# Altium PCB ArmBand-Control-Board.PcbDoc (part 2 of 3)
Units mm, origin at the board's own origin, x right, y up, seen from the top; angles counter-clockwise.
Board outline 45 x 45 mm, 2 copper layers (Top Layer, Bottom Layer), stack 0.864 mm thick; 111 components, 96 nets, 439 pads, 181 vias.
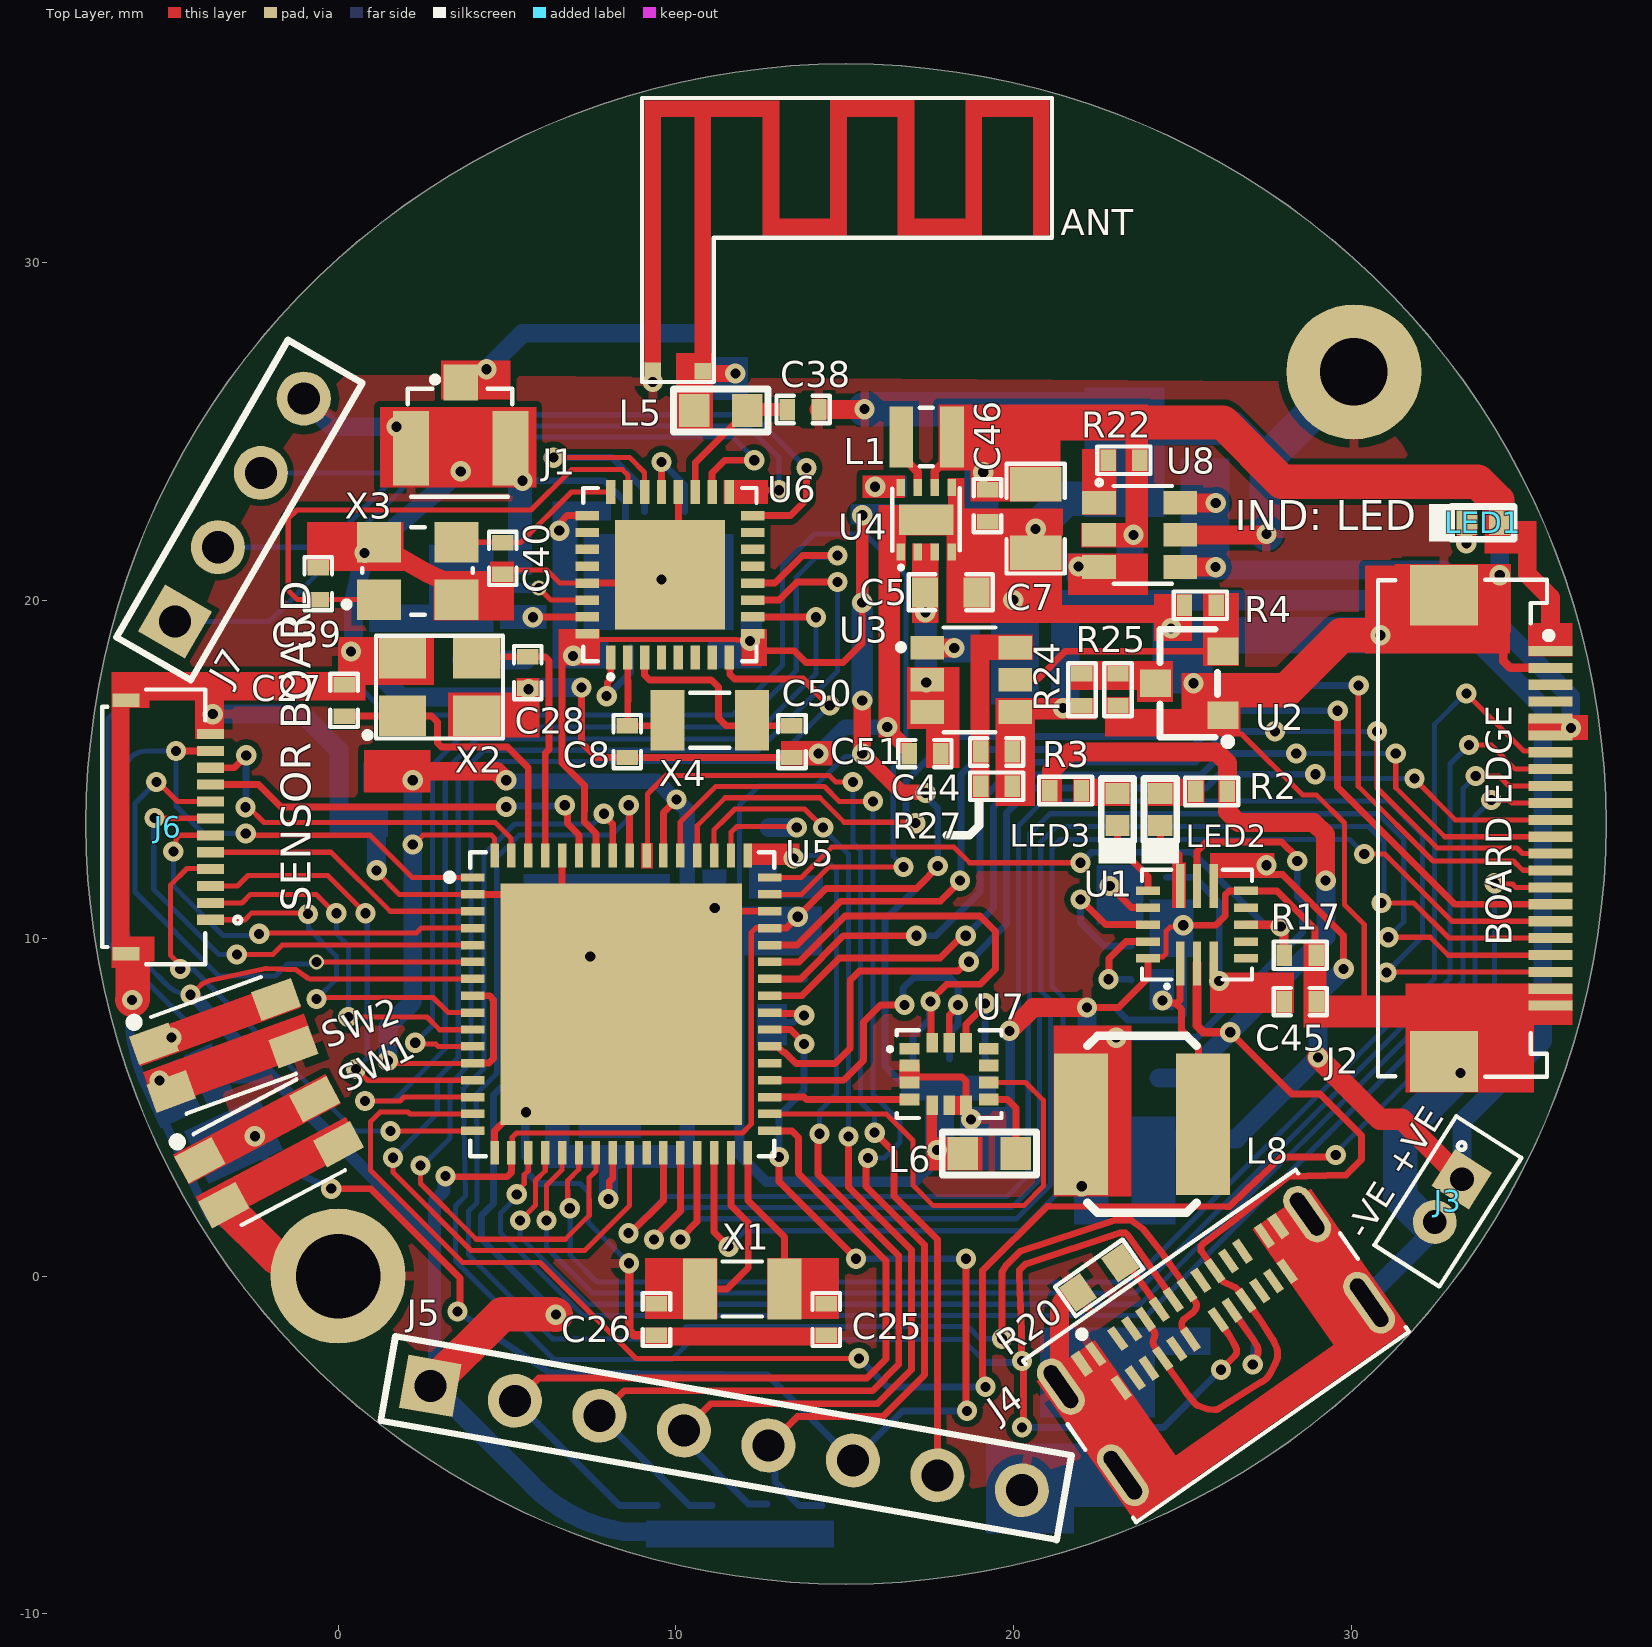
[diagram p0: Top Layer view]

## Part data (continued)
R4 R5 R6 R12 R18 R19 R22 R23 R25 R27: library part RC0402FR-0710KL, "RES SMD 10K OHM 1% 1/16W 0402", Case Code (Imperial)=0402, Case Code (Metric)=1005, Manufacturer=Yageo, Max Operating Temperature=155°C, Min Operating Temperature=-55°C, Power Rating=62.5mW, Resistance=10kR, Supplier Part Number 1=311-10.0KLRDKR-ND, Temperature Coefficient=100ppm/°C, Tolerance=1%, Voltage Rating=50V, Case/Package=0402, ComponentLink1Description=http://www.farnell.com/datasheets/2167052.pdf?src-supplier=Element14, ComponentLink1URL=http://www.farnell.com/datasheets/2167052.pdf?src-supplier=Element14, ComponentLink2Description=http://www.farnell.com/datasheets/1686128.pdf?src-supplier=Element14, ComponentLink2URL=http://www.farnell.com/datasheets/1686128.pdf?src-supplier=Element14, ComponentLink3Description=http://www.farnell.com/datasheets/1784430.pdf?src-supplier=Element14, ComponentLink3URL=http://www.farnell.com/datasheets/1784430.pdf?src-supplier=Element14, ComponentLink4Description=http://www.yageo.com/documents/recent/PYu-RC_Group_51_RoHS_L_9.pdf?src-supplier=Mouser, ComponentLink4URL=http://www.yageo.com/documents/recent/PYu-RC_Group_51_RoHS_L_9.pdf?src-supplier=Mouser, Composition="Thick Film", Depth=0.5mm, Height=0.32mm, Lead Free="Lead Free", Lead Pitch=0.2mm, Length=1mm, Manufacturer Part Number=RC0402FR-0710KL, Military Standard=Not, Number of Pins=2, Number of Terminations=2, Packaging="Tape and Reel", Pricing 1="1=0.1, 10=0.016, 100=0.0064, 1000=0.00289, 2500=0.00251, 5000=0.00207 (USD)", REACH SVHC="No SVHC", Stock 1=60122563, Supplier 1=Digi-Key, Termination=SMD/SMT, Voltage Rating (DC)=50V, Width=0.5mm, Working Voltage=50V
R7 R8 R13 R14 R15 R16 R17 R26: library part ERJPA2F1003X, "RES SMD 100K OHM 1% 1/5W 0402", Case Code (Imperial)=0402, Case Code (Metric)=1005, Manufacturer=Panasonic, Manufacturer Part Number=ERJ-PA2F1003X, Max Operating Temperature=155°C, Max Power Dissipation=200mW, Min Operating Temperature=-55°C, Resistance=100kR, Supplier Part Number 1=P17236CT-ND, Temperature Coefficient=100ppm/°C, Tolerance=1%, Voltage Rating=50V, Case/Package=0402, ComponentLink1Description=http://www.farnell.com/datasheets/2051174.pdf?src-supplier=Element14, ComponentLink1URL=http://www.farnell.com/datasheets/2051174.pdf?src-supplier=Element14, ComponentLink2Description=https://industrial.panasonic.com/ww/system/files/data/download/catalog/id_fixed-resistors_e_1.pdf?src-supplier=Digi-Key, ComponentLink2URL=https://industrial.panasonic.com/ww/system/files/data/download/catalog/id_fixed-resistors_e_1.pdf?src-supplier=Digi-Key, Composition="Thick Film", Features="Automotive AEC-Q200", Height=0.016inch, Length=0.039inch, Number of Terminations=2, Packaging="Cut Tape", Power Rating=200mW, Pricing 1="1=0.21, 10=0.175, 100=0.0686, 1000=0.02871, 2500=0.02632, 5000=0.02393 (USD)", REACH SVHC=Unknown, Stock 1=8829, Supplier 1=Digi-Key, Voltage Rating (DC)=50V, Width=0.02inch
R10 R11: library part ERJ2GEJ472X, "RES SMD 4.7K OHM 5% 1/10W 0402", Case Code (Imperial)=0402, Case Code (Metric)=1005, Manufacturer=Panasonic, Manufacturer Part Number=ERJ-2GEJ472X, Max Operating Temperature=155°C, Max Power Dissipation=100mW, Min Operating Temperature=-55°C, Package Quantity=1, Resistance=4.7kR, Resistance Tolerance=5%, Resistor Type="Thick Film", Temperature Coefficient=200ppm/°C, Voltage Rating=50V, Case/Package=0402, Category="Chip SMD Resistors", ComponentLink1Description=https://datasheet.ciiva.com/11821/0900766b80f806dd-11821328.pdf?src-supplier=RSComponents, ComponentLink1URL=https://datasheet.ciiva.com/11821/0900766b80f806dd-11821328.pdf?src-supplier=RSComponents, ComponentLink2Description=https://datasheet.ciiva.com/46377/1678796-46377565.pdf?src-supplier=Element14, ComponentLink2URL=https://datasheet.ciiva.com/46377/1678796-46377565.pdf?src-supplier=Element14, ComponentLink3Description=https://datasheet.ciiva.com/28514/1678796-28514168.pdf?src-supplier=Element14, ComponentLink3URL=https://datasheet.ciiva.com/28514/1678796-28514168.pdf?src-supplier=Element14, ComponentLink4Description=https://datasheet.ciiva.com/16758/70260739-16758341.pdf?src-supplier=Allied+Electronics, ComponentLink4URL=https://datasheet.ciiva.com/16758/70260739-16758341.pdf?src-supplier=Allied+Electronics, ComponentLink5Description=https://datasheet.ciiva.com/16770/70260739-16770309.pdf?src-supplier=Allied+Electronics, ComponentLink5URL=https://datasheet.ciiva.com/16770/70260739-16770309.pdf?src-supplier=Allied+Electronics, Construction=Rectangular, Contact Plating=Tin, Depth=0.5mm, Features="Automotive AEC-Q200", Height=0.35mm, Lead Free="Lead Free", Length=1mm, Military Standard=Not, Mount="Surface Mount", Number of Terminations=2, Packaging="Cut Tape", Power Rating=100mW, Pricing 1="10000=0.00340 (USD)", Radiation Hardening=No, REACH SVHC="No SVHC", RoHS=Yes, RoHS Compliant=Yes, Series=ERJ, Size Code=0402, Stock 1=1650000, Supplier 1="Arrow Electronics", Supplier Part Number 1=ERJ-2GEJ472X, Technology="THICK FILM", Termination=SMD/SMT, Tolerance=5%, Voltage Rating (DC)=50V, Width=0.5mm
R20 R21: library part RMCF0603FT5K10, "RES 5.1K OHM 1% 1/10W 0603", Case Code (Imperial)=0603, Case Code (Metric)=1608, Manufacturer="Stackpole Electronics", Max Operating Temperature=155°C, Max Power Dissipation=100mW, Min Operating Temperature=-55°C, Resistance=5.1kR, Resistor Type="Thick Film", Supplier Part Number 1=RMCF0603FT5K10DKR-ND, Temperature Coefficient=100ppm/°C, Tolerance=1%, Case/Package=0603, ComponentLink1Description=https://www.seielect.com/catalog/SEI-RMCF_RMCP.pdf?src-supplier=Avnet, ComponentLink1URL=https://www.seielect.com/catalog/SEI-RMCF_RMCP.pdf?src-supplier=Avnet, ComponentLink2Description=http://components.arrow.com/part/dataview/50863347S9465827N1174?src-supplier=Arrow+Electronics, ComponentLink2URL=http://components.arrow.com/part/dataview/50863347S9465827N1174?src-supplier=Arrow+Electronics, ComponentLink3Description=https://www.seielect.com/catalog/SEI-Packaging.pdf?src-supplier=Digi-Key, ComponentLink3URL=https://www.seielect.com/catalog/SEI-Packaging.pdf?src-supplier=Digi-Key, Contact Plating=Tin,Matte, Features="Automotive AEC-Q200", Height=0.022inch, Length=0.061inch, Manufacturer Part Number=RMCF0603FT5K10, Mount="Surface Mount", Number of Terminations=2, Packaging="Tape and Reel", Pricing 1="1=0.1, 10=0.017, 100=0.0068, 1000=0.00305, 2500=0.00264 (USD)", Radiation Hardening=No, RoHS Compliant=Yes, Series=RMCF, Stock 1=58341, Supplier 1=Digi-Key, Width=0.031inch
R24: library part AC0402DR-0710K7L, "RES SMD 0402 10.7kOhm 0.5% Paper T/R", Manufacturer=Yageo, Category="Chip SMD Resistors", Manufacturer Part Number=AC0402DR-0710K7L, Pricing 1="10000=0.00820 (USD)", RoHS=Yes, RoHS Compliant=Yes, Supplier 1=Avnet, Supplier Part Number 1=AC0402DR-0710K7L
SB1 SB2 SB3: "Solder Bridge ON"
SW1 SW2: "3mm 2mm Round Button 50mA Top3.65mm SPST 12V SMD Tactile Switches", Manufacturer=XKB, ComponentLink1Description=LCSC, ComponentLink1URL=https://lcsc.com/product-detail/Tactile-Switches_XKB-Connectivity-TS-1185EC-C-D-B_C318893.html, Manufacturer Part Number=TS-1185EC-C-D-B
U1: "2.1A, 1- OR 2-CELL LI-ION BATTER", Manufacturer="Monolithic Power Systems", Supplier Part Number 1=1589-MP2615CGQ-ZCT-ND, Category=Uncategorized, Manufacturer Part Number=MP2615CGQ-Z, Pricing 1="1=2.38000, 10=2.13500, 25=2.01400, 100=1.71590, 250=1.61120, 500=1.40980, 1000=1.16812, 2500=1.14000 (USD)", RoHS=No, Stock 1=5000, Supplier 1=Digi-Key
U2: "IC MPU/RESET CIRC SOT23-3", Case/Package=SOT-23, Manufacturer=Maxim, Max Operating Temperature=105°C, Max Output Current=20mA, Max Power Dissipation=320mW, Max Reset Threshold Voltage=2.96V, Max Supply Voltage=5.5V, Min Operating Temperature=-40°C, Min Reset Threshold Voltage=2.89V, Min Supply Voltage=1.2V, Nominal Supply Current=17uA, Number of Voltages Monitored=1, Operating Supply Current=60uA, Supplier Part Number 1=700-MAX809SEURT, Threshold Voltage=2.93V, Category="Voltage Supervisors", ComponentLink1Description=https://datasheet.ciiva.com/1169/max803-max810z-1169879.pdf?src-supplier=Element14, ComponentLink1URL=https://datasheet.ciiva.com/1169/max803-max810z-1169879.pdf?src-supplier=Element14, ComponentLink2Description=https://datasheet.ciiva.com/1169/max803-max810z-1169878.pdf?src-supplier=Element14, ComponentLink2URL=https://datasheet.ciiva.com/1169/max803-max810z-1169878.pdf?src-supplier=Element14, ComponentLink3Description=https://datasheet.ciiva.com/14226/max803-max810z-14226330.pdf?src-supplier=Avnet, ComponentLink3URL=https://datasheet.ciiva.com/14226/max803-max810z-14226330.pdf?src-supplier=Avnet, ComponentLink4Description=https://datasheet.ciiva.com/1973/max803-max810z-1973322.pdf?src-supplier=Digi-Key, ComponentLink4URL=https://datasheet.ciiva.com/1973/max803-max810z-1973322.pdf?src-supplier=Digi-Key, ComponentLink5Description=https://datasheet.ciiva.com/1973/max803-max810z-1973323.pdf?src-supplier=Digi-Key, ComponentLink5URL=https://datasheet.ciiva.com/1973/max803-max810z-1973323.pdf?src-supplier=Digi-Key, ComponentLink6Description=https://datasheet.ciiva.com/1973/max803-max810z-1973321.pdf?src-supplier=Digi-Key, ComponentLink6URL=https://datasheet.ciiva.com/1973/max803-max810z-1973321.pdf?src-supplier=Digi-Key, Height=0.94mm, Lead Free="Lead Free", Length=2.92mm, Manufacturer Part Number=MAX809SEUR+T, Mount="Surface Mount", Number of Pins=3, Output=TOTEM-POLE, Output Type=PUSH-PULL, Overvoltage Threshold=2.96V, Package Quantity=1, Packaging="Cut Tape", Power Dissipation=320mW, Pricing 1="1=3.68000, 10=3.31000, 25=3.13000, 50=3.13000, 100=2.72000, 250=2.58000, 500=2.31000, 1000=2.09000, 10000=2.01000 (USD)", Radiation Hardening=No, REACH SVHC="No SVHC", Reset="Active Low", Reset Timeout=140ms, RoHS=Yes, RoHS Compliant=Yes, Series=-, Stock 1=26180, Supplier 1=Mouser, Termination=SMD/SMT, Type="Simple Reset/Power-On Reset", Undervoltage Threshold=2.89V, Watchdog Timer=No, Width=1.3mm
U3: "IC PWR SWITCH P-CH 1:1 SUPERSOT6", Case/Package=SOT-23-6, Continuous Drain Current (ID)=2.3A, Drain to Source Voltage (Vdss)=20V, Manufacturer="ON Semiconductor / Fairchild", Max Operating Temperature=150°C, Max Power Dissipation=700mW, Min Input Voltage=3V, Min Operating Temperature=-55°C, On-State Resistance=80mR, Output Current=1.6A, Package Quantity=3000, Supplier Part Number 1=58K8823, Category="Hot Swap Controllers", ComponentLink1Description=https://datasheet.ciiva.com/34302/1222713-34302120.pdf?src-supplier=Jameco, ComponentLink1URL=https://datasheet.ciiva.com/34302/1222713-34302120.pdf?src-supplier=Jameco, ComponentLink2Description=https://datasheet.ciiva.com/4898/fdc6330l-102811-4898611.pdf?src-supplier=Mouser, ComponentLink2URL=https://datasheet.ciiva.com/4898/fdc6330l-102811-4898611.pdf?src-supplier=Mouser, ComponentLink3Description=https://datasheet.ciiva.com/1171/fdc6330l-1171185.pdf?src-supplier=Newark, ComponentLink3URL=https://datasheet.ciiva.com/1171/fdc6330l-1171185.pdf?src-supplier=Newark, ComponentLink4Description=https://datasheet.ciiva.com/1572/276121-1572006.pdf?src-supplier=Farnell, ComponentLink4URL=https://datasheet.ciiva.com/1572/276121-1572006.pdf?src-supplier=Farnell, ComponentLink5Description=https://datasheet.ciiva.com/28483/276121-28483263.pdf?src-supplier=Element14, ComponentLink5URL=https://datasheet.ciiva.com/28483/276121-28483263.pdf?src-supplier=Element14, ComponentLink6Description=https://datasheet.ciiva.com/1512/276121-1512459.pdf?src-supplier=Element14, ComponentLink6URL=https://datasheet.ciiva.com/1512/276121-1512459.pdf?src-supplier=Element14, ComponentLink7Description=https://datasheet.ciiva.com/3232/fdc6330l-3232841.pdf?src-supplier=Avnet, ComponentLink7URL=https://datasheet.ciiva.com/3232/fdc6330l-3232841.pdf?src-supplier=Avnet, ComponentLink8Description=https://datasheet.ciiva.com/17090/fdc6330l-17090428.pdf?src-supplier=Future+Electronics, ComponentLink8URL=https://datasheet.ciiva.com/17090/fdc6330l-17090428.pdf?src-supplier=Future+Electronics, ComponentLink9Description=https://datasheet.ciiva.com/3232/fdc6330l-3232552.pdf?src-supplier=Avnet, ComponentLink9URL=https://datasheet.ciiva.com/3232/fdc6330l-3232552.pdf?src-supplier=Avnet, ComponentLink10Description=https://datasheet.ciiva.com/1962/fdc6330l-1962053.pdf?src-supplier=Digi-Key, ComponentLink10URL=https://datasheet.ciiva.com/1962/fdc6330l-1962053.pdf?src-supplier=Digi-Key, ComponentLink11Description=https://datasheet.ciiva.com/1962/fdc6330l-1962054.pdf?src-supplier=Digi-Key, ComponentLink11URL=https://datasheet.ciiva.com/1962/fdc6330l-1962054.pdf?src-supplier=Digi-Key, ComponentLink12Description=https://datasheet.ciiva.com/1962/fdc6330l-1962052.pdf?src-supplier=Digi-Key, ComponentLink12URL=https://datasheet.ciiva.com/1962/fdc6330l-1962052.pdf?src-supplier=Digi-Key, Current=2.3A, Current Rating=2.3A, Height=1mm, Interface=On/Off, Lead Free="Lead Free", Length=3mm, Manufacturer Part Number=FDC6330L, Max Input Voltage=20V, Max Output Current=2.3A, Max Supply Voltage=20V, Min Supply Voltage=3V, Mount="Surface Mount", Number of Outputs=1, Number of Pins=6, Operating Supply Voltage=20V, Output Configuration="High Side", Packaging="Tape and Reel", Power Dissipation=700mW, Power Rating=700mW, Pricing 1="1=0.70000, 25=0.57700, 50=0.52400, 100=0.47100, 250=0.43700, 500=0.37200, 1000=0.30700 (USD)", Radiation Hardening=No, REACH SVHC="No SVHC", RoHS=Yes, RoHS Compliant=Yes, Supplier 1=Newark, Voltage=20V, Voltage Rating (DC)=20V, Weight=0.036g, Width=1.7mm
U4: "Buck Switching Regulator IC Positive Fixed 3.3V 1 Output 1A 8-WFDFN Exposed Pad", Case/Package=SOIC, Manufacturer="Texas Instruments", Max Input Voltage=17V, Max Operating Temperature=125°C, Max Output Current=1A, Max Output Voltage=3.3V, Min Input Voltage=3V, Min Operating Temperature=-40°C, Package Quantity=3000, Quiescent Current=17uA, Supplier Part Number 1=595-TPS62162DSGR, Switching Frequency=2.25MHz, Category="Voltage Regulators - Switching", ComponentLink1Description=https://datasheet.ciiva.com/2034/tps62161-2034675.pdf?src-supplier=Digi-Key, ComponentLink1URL=https://datasheet.ciiva.com/2034/tps62161-2034675.pdf?src-supplier=Digi-Key, Contact Plating=Gold, Lead Free="Lead Free", Manufacturer Part Number=TPS62162DSGR, Min Output Voltage=3.3V, Number of Outputs=1, Number of Pins=8, Operating Supply Voltage=17V, Output Configuration=Positive, Output Current=1A, Output Type=Fixed, Output Voltage=3.3V, Packaging="Tape and Reel", Pricing 1="1=1.59000, 10=1.44000, 25=1.36000, 50=1.36000, 100=1.16000, 250=1.09000, 500=0.94700, 1000=0.78500, 10000=0.78400 (USD)", Radiation Hardening=No, RoHS=Yes, RoHS Compliant=Yes, Series=DCS-Control™, Supplier 1=Mouser, Synchronous Rectifier=Yes
U5: "IC MCU 32BIT 512KB FLASH 64QFN", Case/Package=QFN, Frequency=120MHz, Manufacturer=Microchip, Max Operating Temperature=85°C, Min Operating Temperature=-40°C, Supplier Part Number 1=ATSAM4S8BA-MU-ND, Category=Microcontrollers, ComponentLink1Description=http://www.microchip.com/mymicrochip/filehandler.aspx?ddocname=en590343&src-supplier=Digi-Key, ComponentLink1URL=http://www.microchip.com/mymicrochip/filehandler.aspx?ddocname=en590343&src-supplier=Digi-Key, Core Architecture=ARM, Interface=I2C,SPI,USB,IrDA,UART,USART, Manufacturer Part Number=ATSAM4S8BA-MU, Memory Size=512KB, Memory Type=FLASH, Number of I/Os=47, Oscillator Type=Internal, Packaging=Tray, Peripherals="Brown-out Detect/Reset,POR,PWM,WDT,DMA", Pricing 1="1=6.23000, 25=5.66960, 100=5.13000 (USD)", RoHS=Yes, RoHS Compliant=Yes, Supplier 1=Digi-Key
U6: "IC RF TXRX+MCU BLUETOOTH 32WFQFN", Manufacturer="Nordic Semiconductor", Supplier Part Number 1=1490-NRF52810-QCAA-RCT-ND, Category="RF Receivers, Transceivers", Manufacturer Part Number=NRF52810-QCAA-R, Pricing 1="1=3.54000, 10=3.16200, 25=2.84640, 100=2.59320, 250=2.34024, 500=2.09990, 1000=1.77100 (USD)", RoHS=Yes, RoHS Compliant=Yes, Stock 1=2906, Supplier 1=Digi-Key
U7: "iNEMO Inertial Module: 3D Accelerometer and 3D Gyroscope, 1.71V to 3.6V, -40°C to 85°C, VFLGA-14L, RoHS", Manufacturer=STMicroelectronics, Supplier Part Number 1=03AH2347, Category="Inertial Measurement Units (IMUs)", ComponentLink1Description=https://www.st.com/resource/en/datasheet/lsm6dsr.pdf?src-supplier=Digi-Key, ComponentLink1URL=https://www.st.com/resource/en/datasheet/lsm6dsr.pdf?src-supplier=Digi-Key, Manufacturer Part Number=LSM6DSRTR, RoHS=Yes, RoHS Compliant=Yes, Supplier 1=Newark
U8: "300mA 75dB@1kHz 10nA 90mV 2.8V~2.8V 2 6V SOT-23-6 Linear Voltage Regulators (LDO) ROHS", Manufacturer=AnaSem, ComponentLink1Description=LCSC, ComponentLink1URL=https://lcsc.com/product-detail/Linear-Voltage-Regulators-LDO_AnaSem-VRD2828PTX_C697937.html, Manufacturer Part Number=VRD2828PTX
X1 X4: library part X321532768KGD2SI, "32.768kHz SMD Crystal Resonator 12.5pF ±20ppm -40℃~+85℃ SMD3215-2P Crystals ROHS", Manufacturer="Yangxing Tech", ComponentLink1Description=LCSC, ComponentLink1URL=https://www.lcsc.com/product-detail/Crystals_Yangxing-Tech-X321532768KGD2SI_C620155.html, Manufacturer Part Number=X321532768KGD2SI
X2: library part X322516MOB4SI, "16MHz SMD Crystal Resonator 12pF ±10ppm ±30ppm -40℃~+85℃ SMD3225-4P Crystals ROHS", Manufacturer="Yangxing Tech", ComponentLink1Description=LCSC, ComponentLink1URL=https://www.lcsc.com/product-detail/Crystals_Yangxing-Tech-X322516MOB4SI_C12668.html, Manufacturer Part Number=X322516MOB4SI
X3: library part XC32M4-32.000-F12NLDT, "32MHz SMD Crystal Resonator 12pF 40Ω ±10ppm ±20ppm -40℃~+85℃ SMD3225-4P Crystals ROHS", Manufacturer=HCI, Manufacturer Part Number=XC32M4-32.000-F12NLDT

## Free pads (board coordinates)
  round 4 hole 2.5: MH1(0,0)
  round 4 hole 2: MH2(30.074,26.772)

## Via types
v1: diameter 0.6, hole 0.3, Top Layer to Bottom Layer, tented both sides, 178 vias
v2: diameter 0.45, hole 0.3, Top Layer to Bottom Layer, tented both sides, 2 vias
v3: diameter 0.6, hole 0.3, Top Layer to Bottom Layer, 1 vias

## Nets (pads, with @x,y where several pads share a name; then routed paths per layer and width w, separated by ;. In a path a pad name is that pad's centre, name@x,y a point inside that pad or via, vN(x,y) a via of type N, cw(c..) or ccw(c..) an arc to the next point about the centre after c; other vN are vias at no path point)
\A\C\O\K\: LED3.2 U1.12 | length 2.3
  Top Layer w0.203: LED3.2@23.073,13.342 23.073,12.74 23.978,11.836 U1.12@23.978,11.406
\C\H\G\O\K\: LED2.2 U1.11 | length 2.2
  Top Layer w0.203: LED2.2@24.343,13.342 24.343,12.766 24.484,12.626 24.747,12.626 24.892,12.481 24.892,12.223 24.904,12.211 24.904,11.579 U1.11@24.928,11.556
ANT: C38.2 L5.2 U6.19 | length 4.4
  Top Layer w0.203: U6.19@10.575,23.216 10.575,24.09 11.73,25.245 11.765,25.245 12.113,25.594 L5.2@12.113,25.629 ; C38.2@13.17,25.527 C38.2@13.297,25.654
  Top Layer w0.381: L5.2@12.139,25.654 C38.2@13.297,25.654
ANT#: ANT.ANT# L5.1 SB3.1 | length 4.1
  Top Layer w0.5: 10.541,27.076 10.541,26.79 10.541,26.721 ; L5.1@10.543,25.629 10.541,25.631 10.541,26.721 ; 10.566,26.187 10.566,26.274 ; v3@11.733,26.721 10.541,26.721
  Bottom Layer w0.5: SB3.1@10.566,26.391 10.602,26.426 11.438,26.426 11.733,26.721 v3(11.76,26.721)
AVDD: C32.1 L3.2 U6.30 | length 3.2
  Top Layer w0.152: v2(5.944,20.371) 6.299,20.015 U6.30@7.374,20.015
  Bottom Layer w0.152: 4.394,20.269 4.496,20.371
  Bottom Layer w0.305: 4.496,20.371 v2(5.944,20.371)
BATT_EN: R17.2 U1.6 U5.48 | length 18.8
  Top Layer w0.152: U5.48@12.782,11.802 13.715,11.802 14.613,12.7 18.237,12.7 18.697,12.239 v1(21.981,12.239)
  Top Layer w0.254: U1.6@26.878,10.406 26.88,10.404 27.853,10.404 v1(27.906,10.351) ; v1@27.894,10.408 v1@27.933,10.447 ; v1@27.975,10.404 27.991,10.389 28.002,10.377 28.002,9.51 R17.2@28.014,9.499
  Bottom Layer w0.203: v1(21.981,12.239) 21.99,12.239 22.299,12.548 25.298,12.548 27.476,10.37 27.887,10.37 v1(27.906,10.351)
BST: C22.1 L8.1 U1.1 | length 6.2
  Top Layer w0.203: v1(24.403,8.159) 24.479,8.083 24.78,8.083 24.805,8.059 24.809,8.059 ; U1.1@24.928,9.256 24.928,8.178 24.809,8.059 ; L8.1@25.6,4.496 25.476,4.619 25.476,6.782 24.965,7.293 24.965,7.902 24.809,8.059
  Bottom Layer w0.203: v1(24.403,8.159) 24.464,8.22 24.464,8.703 C22.1@24.524,8.763
DDM: J4.A7 J4.B7 U5.56 | length 46.5
  Top Layer w0.203: v1(8.605,13.94) 8.632,13.913 U5.56@8.632,12.452 ; v1(19.655,-1.854) 19.655,0.12 19.787,0.336 20.188,0.737 22.992,1.66 23.476,1.66 23.841,1.385 24.354,0.743 24.363,0.73 25.036,-0.231 25.146,-0.402 25.184,-0.461 25.293,-0.632 25.375,-0.75 cw(c25.209,-0.867) 25.408,-0.827 25.409,-0.832 cw(c25.21,-0.872) 25.379,-0.984 25.346,-1.033 cw(c25.177,-0.92) 25.29,-1.089 25.266,-1.105 25.056,-1.267 ccw(c25.18,-1.428) 24.998,-1.337 24.997,-1.339 ; 24.997,-1.34 ccw(c25.179,-1.43) 25.012,-1.547 25.078,-1.641 J4.B7@25.235,-1.865 J4.B7@25.066,-1.649
  Bottom Layer w0.152: v1(8.605,13.94) 8.575,13.909 8.575,13.528 8.102,13.055 5.359,13.055 4.699,12.395 4.699,6 4.149,5.45 4.089,5.39 4.089,5.227 4.115,4.261 4.115,2.176 3.861,1.922 3.861,0.635 6.353,-1.857 9.949,-1.857 10.307,-1.499 15.316,-1.499 15.321,-1.494 18.644,-1.494 19.005,-1.854 v1(19.655,-1.854)
DDP: J4.A6 J4.B6 U5.57 | length 55.1
  Top Layer w0.203: v1(7.868,13.691) 7.868,13.64 8.132,13.376 U5.57@8.132,12.452 ; v1@20.295,-4.424 20.295,-2.565 v1(20.244,-2.515) 20.234,-2.505 20.234,-1.618 20.234,-1.61 20.168,0.009 20.168,0.178 20.227,0.237 20.346,0.356 23.149,1.279 23.318,1.279 23.39,1.207 24.566,-0.473 J4.A6@24.723,-0.697 ; J4.B6@26.055,-1.291 26.215,-1.513 26.359,-1.719 ; v1(26.137,-2.769) 26.545,-2.362 ccw(c26.402,-2.218) 26.593,-2.148 26.575,-2.099 ; 26.36,-1.72 cw(c26.192,-1.835) 26.369,-1.734 26.504,-1.969 26.56,-2.068 26.561,-2.069 cw(c26.383,-2.168) 26.567,-2.081 26.568,-2.085 cw(c26.384,-2.171) 26.574,-2.098
  Bottom Layer w0.152: v1@7.875,13.672 7.842,13.672 7.555,13.386 5.222,13.386 4.318,12.481 4.318,6.158 3.708,5.548 3.708,5.069 3.777,2.443 3.777,2.378 3.48,2.08 3.48,0.452 6.395,-2.464 9.881,-2.464 10.465,-1.88 18.491,-1.88 19.163,-2.551
  Bottom Layer w0.203: 19.163,-2.551 20.207,-2.551 v1(20.244,-2.515) ; v1@20.345,-4.475 24.43,-4.475 v1(26.137,-2.769)
  other v1: 20.244,-4.475
DEC1: C35.2 U6.1 | length 3
  Top Layer w0.203: v1@7.95,17.145 7.971,17.166 7.971,17.573 8.074,17.676 U6.1@8.074,18.315
  Bottom Layer w0.203: v1@7.95,17.145 7.95,17.153 8.661,17.865 C35.2@8.661,18.618
  other v1: 7.95,17.17
DEC2: C36.2 U6.21 | length 2.5
  Top Layer w0.203: U6.21@9.575,23.321 v1(9.576,24.105)
  Bottom Layer w0.203: v1(9.576,24.105) 10.262,23.419 C36.2@10.262,22.631
DEC3: C37.1 U6.22 | length 7.2
  Top Layer w0.152: v1(6.375,24.232) 8.636,24.232 9.074,23.793 U6.22@9.074,23.216
  Bottom Layer w0.203: v1(6.375,24.232) 8.114,24.232 9.068,23.278 C37.1@9.068,22.631
ERASE: J5.7 U5.55 | length 29.8
  Top Layer w0.152: U5.55@9.132,12.452 9.159,12.479 9.159,14.271 9.712,14.824 14.538,14.824 14.732,14.63 v1(15.24,14.63)
  Top Layer w0.203: U5.55@9.132,12.452 9.155,12.475 U5.55@9.132,12.499 ; v1(15.885,4.248) 16.459,3.673 16.459,2.367 17.74,1.086 J5.7@17.74,-5.895
  Bottom Layer w0.152: v1(15.24,14.63) 15.24,12.828 15.469,12.6 15.469,5.156 15.885,4.74 v1(15.885,4.248)
GND: ANT.GND C1.2 C2.2 C3.2 C4.2 C5.2 C6.2 C7.2 C8.1 C9.2 C10.2 C11.2 C12.2 C13.2 C14.2 C15.2 C16.1 C17.2 C18.2 C19.2 C20.2 C21.2 C23.2 C24.2 C25.1 C26.1 C27.1 C28.1 C31.2 C32.2 C33.2 C34.2 C35.1 C36.1 C37.2 C38.1 C39.1 C40.1 C41.2 C42.2 C43.2 C45.2 C46.2 C47.2 C48.2 C49.2 C50.1 C51.2 J1.2 J1.3 J2.2 J2.21 J2.22 J2.MP1 J2.MP2 J3.2 J4.A1 J4.A12 J4.B1 J4.B12 J4.G1 J4.G2 J4.S1 J4.S2 J4.S3 J4.S4 J5.8 J6.12 J6.MP1 J6.MP2 J7.4 pad.MH1 pad.MH2 R4.1 R9.2 R17.1 R19.2 R20.1 R21.1 R25.2 R28.1 SW1.2 SW2.2 U1.8 U1.16 U2.1 U4.1 U4.4 U4.5 U4.9 U5.2 U5.17 U5.46 U5.60 U5.65 U6.20 U6.29 U6.33 U7.2 U7.3 U7.6 U7.7 U8.5 X2.2 X2.4 X3.2 X3.4 | length 195.3
  Top Layer w0.152: v1@-5.309,5.944 v1(-5.283,5.791) ; v1(1.143,12.014) 1.143,11.972 1.813,11.302 U5.2@3.982,11.302 ; X3.2@4,20.142 4.763,20.904 6.178,20.904 6.566,20.516 U6.29@7.374,20.516 ; U1.16@23.978,9.406 24.026,9.455 24.422,9.455 24.511,9.544 24.511,10.211 24.633,10.332 24.963,10.332 v1(25.019,10.389) ; U2.1@26.197,16.601 26.197,16.501 26.645,16.053 26.745,16.053 28.549,14.249 28.956,14.249 29.794,13.411 29.794,10.998 30.378,10.414 30.378,7.95
  Top Layer w0.203: X3.4@1.168,21.895 X3.4@1.168,22.212 ; U5.2@3.982,11.302 U5.65@5.563,11.302 ; U5.17@4.632,3.652 4.632,4.302 U5.65@5.486,5.156 ; U5.65@5.486,4.801 U5.65@5.486,5.156 ; U5.65@6.198,9.703 6.632,10.137 U5.60@6.632,12.452 U5.60@6.632,12.487 ; v1(7.209,17.424) 7.209,15.804 7.656,15.356 C8.1@8.56,15.356 ; U6.29@7.374,20.516 9.575,20.516 U6.33@9.824,20.766 10.074,21.015 U6.20@10.074,23.216 ; C8.1@8.56,15.354 13.297,15.354 13.322,15.329 13.348,15.354 14.11,15.354 v1(14.224,15.469) ; U5.46@12.782,10.802 11.132,10.802 U5.65@8.382,8.052 U5.65@5.486,5.156 ; U7.3@16.916,5.732 17.077,5.893 18.472,5.893 18.591,5.774 U7.7@18.591,5.057 U7.7@18.665,4.984 ; 18.385,5.055 18.741,4.699 v1(18.741,4.641) ; v1(22.174,7.95) 23.107,7.95 23.978,8.82 U1.16@23.978,9.406 ; v1(25.019,10.389) 25.984,10.389 26.264,10.668 26.264,11.264 ; 26.264,11.289 26.383,11.408 ; 26.408,11.406 U1.8@26.854,11.406 ; U1.8@26.854,11.383 U1.8@26.878,11.406 27.793,11.406 28.918,10.281 28.918,8.852 ; 28.909,8.861 28.88,8.832 28.88,8.201 C45.2@28.953,8.127 ; R17.1@28.909,9.529 R17.1@28.909,9.604 ; 28.918,8.649 C45.2@29.159,8.407 ; R17.1@28.953,9.499 R17.1@28.953,9.529 ; R17.1@28.984,9.529 29.122,9.39 29.122,8.852
  Top Layer w0.254: v1(8.615,0.381) 8.615,-1.604 8.764,-1.753 C26.1@9.423,-1.753 ; 34.239,19.075 34.496,18.819 34.496,18.209 34.696,18.009 J2.2@35.89,18.009
  Top Layer w0.457: v1(16.256,16.256) 16.332,16.256 16.408,16.18 16.408,16.053 16.904,15.557 C51.2@16.904,15.469 ; 34.139,6.086 34.937,6.883
  Top Layer w0.5: v1(9.317,26.472) ANT.GND@9.317,26.791 9.317,27.077
  Top Layer w0.559: v1(-3.708,16.637) -3.81,16.739 -3.81,17.323 -3.67,17.462 -2.921,17.462 ; X3.4@1.212,21.729 1.583,21.408 2.676,20.796 ccw(c2.862,21.129) 2.702,20.783 3.099,20.599 X3.2@3.512,20.029 ; 3.15,23.963 v1@3.521,23.68 ; C38.1@14.237,25.654 14.243,25.66 15.578,25.66 v1(15.584,25.667) ; 16.332,20.523 16.332,21.438 16.434,21.539 ; v1(19.876,7.262) 19.887,7.262 20.575,7.95 v1(22.174,7.95) ; R20.1@21.906,-0.488 ccw(c21.906,-1.032) 21.361,-1.032 21.361,-2.362 ccw(c22.25,-2.362) 22.25,-3.251 ; U8.5@24.93,21.946 27.446,21.946 27.472,21.971 v1(27.483,21.971) ; U2.1@26.187,16.611 U2.1@26.197,16.601 ; C45.2@28.918,8.105 28.953,8.105 28.953,7.699 ; J2.MP2@33.468,6.833 34.036,6.264 34.036,6.198
  Top Layer w1.016: v1(-6.096,8.179) -6.079,8.196 J6.MP2@-6.079,9.355 ; SW1.2@-3.385,2.105 -1.852,0.571 -0.512,0.571 pad.MH1@-0.02,0.079 ; 26.086,17.247 26.187,17.348 28.067,17.348 29.693,18.974 v1(30.861,18.974)
  Bottom Layer w0.152: 6.223,2.743 7.163,2.743 7.414,2.492 7.414,1.582 v1(8.615,0.381)
  Bottom Layer w0.203: v1(5.461,23.546) 7.882,23.546 8.509,22.919 8.509,21.692 ; C11.2@5.537,3.531 5.619,3.448 5.619,3.042 5.918,2.743 6.223,2.743 ; v1(9.576,20.625) v1@9.576,20.65 ; v1(22.174,7.95) 23.006,7.95 23.376,7.58 24.86,7.58 25.032,7.752 25.032,9.55 24.981,9.601 24.943,9.601
  Bottom Layer w0.254: v1(-6.096,8.179) -6.066,7.6 -6.066,7.495 -6.171,7.379 -6.171,7.281 -6.171,7.266 ccw(c-0.745,7.899) -5.808,5.848 ccw(c-5.574,5.946) -5.808,5.847 ccw(c-5.574,5.946) -5.751,5.764 ; -5.751,5.764 -5.75,5.763 ccw(c-3.847,7.743) -5.633,5.656 ; -5.611,5.901 -5.151,6.116 -5.323,5.711 -5.41,5.506 ; -5.565,5.598 -5.485,5.552 ; -4.999,5.41 -5.195,4.872 -5.21,4.83 -5.21,4.729 -3.848,1.808 -3.829,1.767 -3.765,1.703 pad.MH1@0,0 ; C11.2@5.537,3.531 5.537,4.826 v1(5.563,4.851)
  Bottom Layer w0.381: v1@-5.558,5.86 -5.557,5.856 -5.502,5.791 -5.496,5.784 -5.49,5.776 -5.41,5.682 -5.383,5.65 -5.323,5.578 -5.131,5.349
  Bottom Layer w0.457: v1(14.224,15.469) 15.011,16.256 v1@16.141,16.256
  Bottom Layer w0.559: v1(-3.708,16.637) -1.041,16.637 0.025,15.57 0.025,13.437 C15.2@1.041,13.437 ; J7.4@-1.016,25.979 -0.183,25.146 v1(1.727,25.146) ; v1(0.381,18.491) 0.457,18.593 0.457,19.888 cw(c0.914,19.888) 0.468,19.988 v1(0.787,21.412) v1(3.632,23.825) ; C15.2@1.13,13.602 1.13,13.348 1.143,13.335 v1(1.143,12.014) ; 1.223,17.805 1.884,17.145 5.399,17.145 v1@5.628,17.374 ; v1(5.639,17.374) 5.65,17.374 5.701,17.424 v1(7.209,17.424) ; C42.2@18.793,3.566 18.831,3.604 C42.2@18.843,3.604 C42.2@18.881,3.566 ; v1@19.863,7.214 19.863,7.249 v1(19.876,7.262) ; C1.2@22.174,5.867 v1(22.174,7.95) ; J4.S2@30.525,-0.787 30.525,-0.552 32.323,1.246 32.323,1.398 J3.2@32.504,1.579 ; v1(34.392,20.752) R28.1@34.392,22.301
  Bottom Layer w1.016: v1(15.584,25.667) 22.606,25.667 23.279,24.994 23.279,24.054 22.238,23.012 21.539,23.012 v1(20.65,22.123) ; C1.2@22.276,5.867 C2.2@22.301,3.937 ; 23.279,24.447 23.952,25.121 26.446,25.121 27.483,24.084 ; v1(27.483,21.971) 27.483,24.084 ; pad.MH2@30.074,26.772 27.483,24.181 27.483,24.084 ; J3.2@32.465,1.603 32.41,1.657 32.128,1.657 31.445,2.34 31.445,4.242 v1(33.223,6.02)
  other v1: 7.468,9.461 11.151,10.897 25.324,17.551 24.663,19.177 19.99,20.015
INT1: U5.35 U7.4 | length 4.1
  Top Layer w0.203: U5.35@12.817,5.302 13.797,5.302 13.867,5.232 U7.4@16.916,5.232
INT2: U5.34 U7.9 | length 14.6
  Top Layer w0.152: U5.34@12.782,4.802 16.229,4.802 17.018,4.013 17.018,2.692 17.623,2.088 20.299,2.088 20.879,2.667 20.879,5.207 20.353,5.732 U7.9@19.266,5.732
LCD_CS: J2.18 U5.29 | length 42.4
  Top Layer w0.152: v1(30.886,11.049) 31.843,11.049 32.884,10.009 J2.18@35.89,10.009
  Top Layer w0.203: v1(10.134,1.087) 10.134,1.117 10.629,1.612 10.629,3.614 U5.29@10.632,3.617
  Bottom Layer w0.152: v1(10.134,1.087) 10.134,1.097 10.738,1.702 20.082,1.702 21.091,2.711 21.091,8.16 20.803,8.448 20.803,12.852 21.26,13.31 30.505,13.31 30.963,12.852 30.963,11.125 v1(30.886,11.049)
LCD_DB0: J2.14 U5.52 | length 33.6
  Top Layer w0.152: U5.52@10.632,12.452 10.632,13.334 11.461,14.164 14.26,14.164 14.987,13.437 17.069,13.437 v1(17.094,13.411) ; v1(30.213,17.488) 30.201,17.475 30.201,14.503 32.41,12.294 34.798,12.294 35.074,12.017 35.882,12.017 J2.14@35.89,12.009
  Bottom Layer w0.203: v1(17.094,13.411) 17.094,13.449 16.815,13.729 16.815,14.656 18.136,15.977 25.07,15.977 26.581,17.488 v1(30.213,17.488)
LCD_DB1: J2.13 U5.42 | length 30.2
  Top Layer w0.152: v1(30.759,16.129) 30.759,14.453 32.537,12.675 34.9,12.675 35.065,12.509 J2.13@35.89,12.509
  Top Layer w0.203: U5.42@12.782,8.802 13.691,8.802 14.969,10.079 v1(17.12,10.079)
  Bottom Layer w0.152: v1(27.737,16.129) v1@30.734,16.129
  Bottom Layer w0.203: v1(17.12,10.079) 17.699,10.079 18.999,11.379 18.999,14.046 20.168,15.215 25.385,15.215 26.3,16.129 v1(27.737,16.129)
LCD_DB2: J2.12 U5.41 | length 29.4
  Top Layer w0.152: v1(31.313,15.474) 31.313,14.457 32.762,13.009 J2.12@35.89,13.009
  Top Layer w0.203: U5.41@12.817,8.302 13.73,8.302 14.847,9.419 17.826,9.419 18.487,10.079 v1(18.583,10.079)
  Bottom Layer w0.152: v1(28.366,15.474) v1(31.313,15.474)
  Bottom Layer w0.203: v1(18.583,10.079) 19.406,10.902 19.406,13.894 20.345,14.834 25.543,14.834 26.184,15.474 v1(28.366,15.474)
LCD_DB3: J2.11 U5.38 | length 30.5
  Top Layer w0.152: v1(31.867,14.732) 31.867,14.716 33.075,13.509 J2.11@35.89,13.509
  Top Layer w0.203: U5.38@12.782,6.802 12.805,6.778 13.03,6.778 13.179,6.63 13.222,6.63 13.557,6.295 14.705,6.295 15.164,6.754 15.164,8.763 15.438,9.038 18.352,9.038 18.621,9.307 v1(18.674,9.307)
  Bottom Layer w0.152: v1(28.931,14.859) 29.016,14.773 29.202,14.773 29.244,14.732 v1(31.867,14.732)
  Bottom Layer w0.203: v1(18.674,9.307) 19.787,10.42 19.787,13.716 20.523,14.453 25.701,14.453 26.107,14.859 v1(28.931,14.859)
LCD_DB4: J2.10 U5.19 | length 44.1
  Top Layer w0.152: v1(5.289,2.422) 5.289,2.511 5.513,2.735 5.513,3.003 5.632,3.122 U5.19@5.632,3.652 ; v1(34.138,14.097) 34.15,14.085 34.666,14.085 34.742,14.009 J2.10@35.89,14.009
  Bottom Layer w0.152: v1(5.289,2.422) 5.289,2.345 4.805,1.861 4.805,1.287 7.256,-1.164 23.932,-1.164 33.655,8.56 33.655,13.614 v1(34.138,14.097)
LCD_DB5: J2.9 U5.20 | length 44.1
  Top Layer w0.152: v1(5.391,1.646) 5.843,2.099 5.843,2.831 6.132,3.119 U5.20@6.132,3.652 ; v1(33.68,14.808) 34.366,14.808 34.666,14.509 J2.9@35.89,14.509
  Bottom Layer w0.152: v1(5.391,1.646) 5.391,1.168 7.392,-0.833 23.748,-0.833 33.299,8.718 33.299,14.427 v1(33.68,14.808)
LCD_DB6: J2.8 U5.21 | length 44.1
  Top Layer w0.152: v1(6.174,1.646) 6.174,2.694 6.632,3.152 U5.21@6.632,3.617 ; v1(33.477,15.723) 34.138,15.723 34.851,15.009 J2.8@35.89,15.009
  Bottom Layer w0.152: v1(6.174,1.646) 6.174,0.852 7.529,-0.503 23.611,-0.503 32.918,8.804 32.918,15.164 v1(33.477,15.723) v1@33.356,15.723